# Altium PCB stm32-electronic-dice.PcbDoc
Units mm, origin at the board's own origin, x right, y up, seen from the top; angles counter-clockwise.
Board outline 85 x 60 mm, 2 copper layers (Top Layer, Bottom Layer); 43 components, 29 nets, 141 pads, 0 vias.
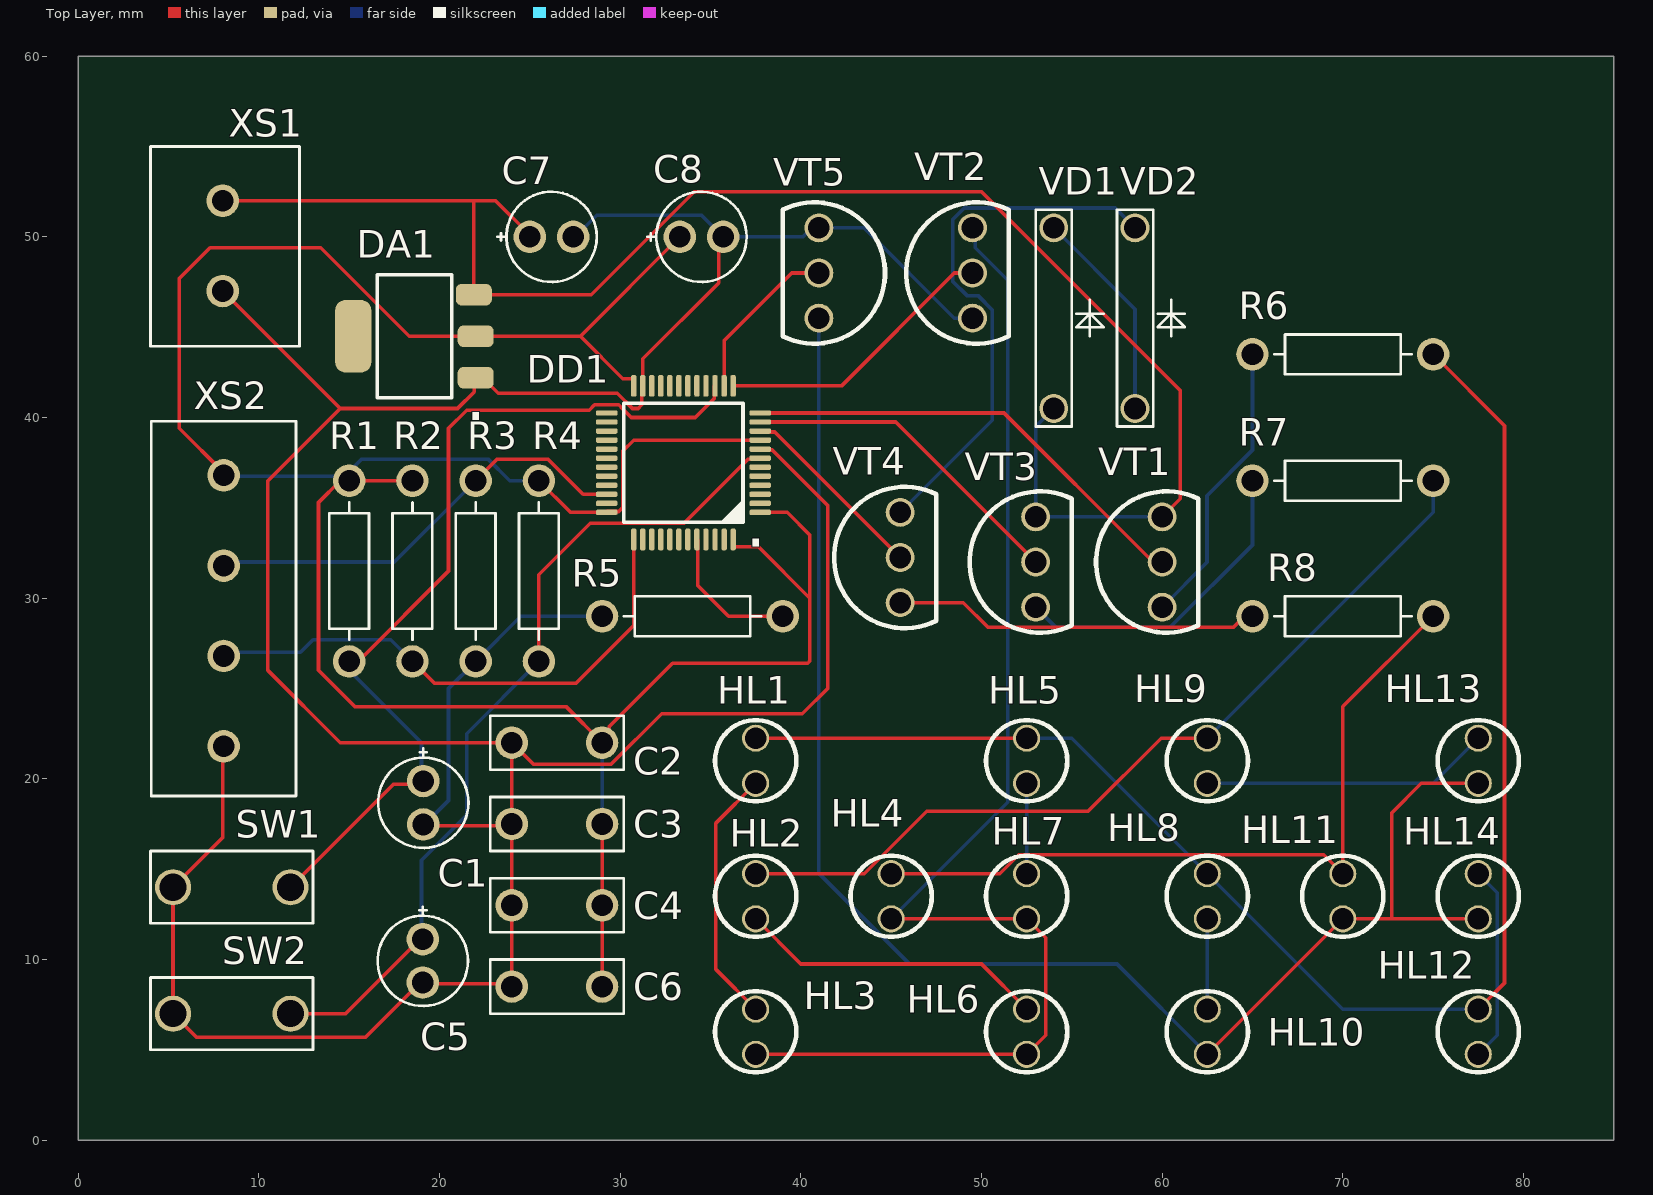
[diagram p0: Top Layer view]
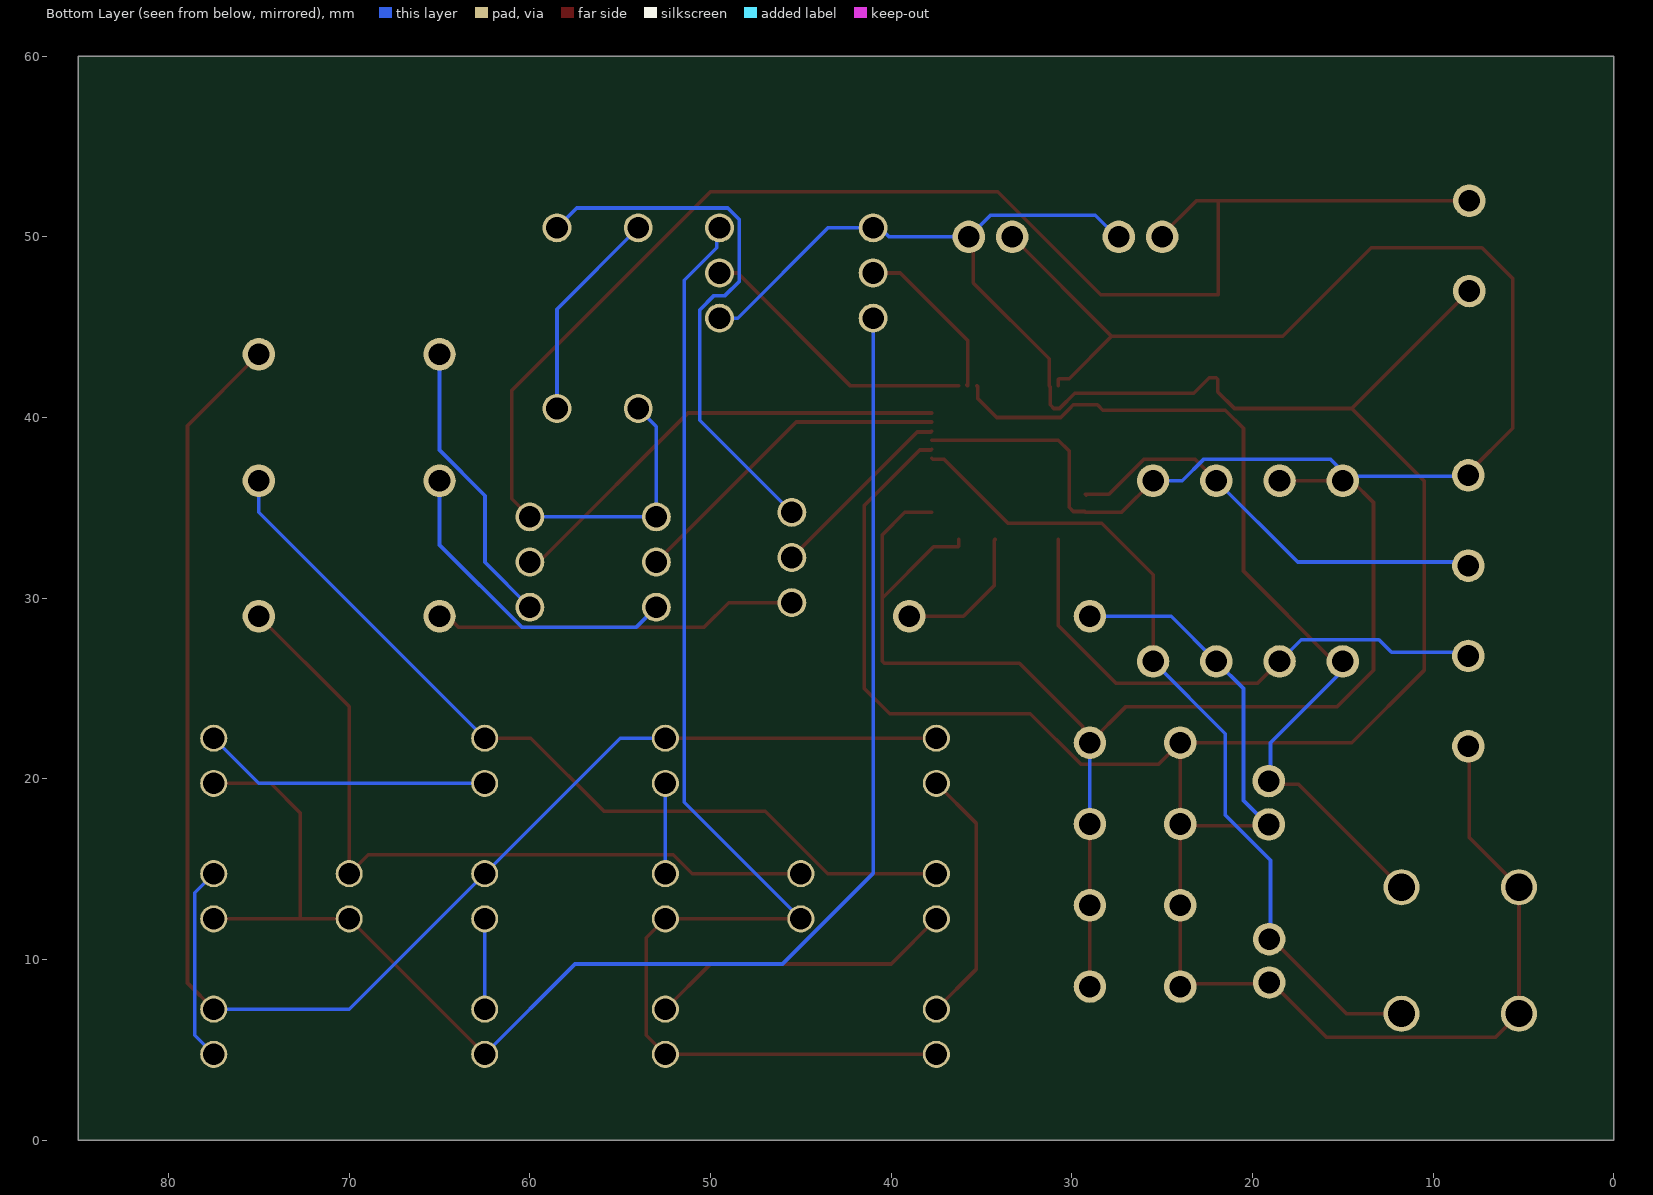
[diagram p1: Bottom Layer view, seen from below]
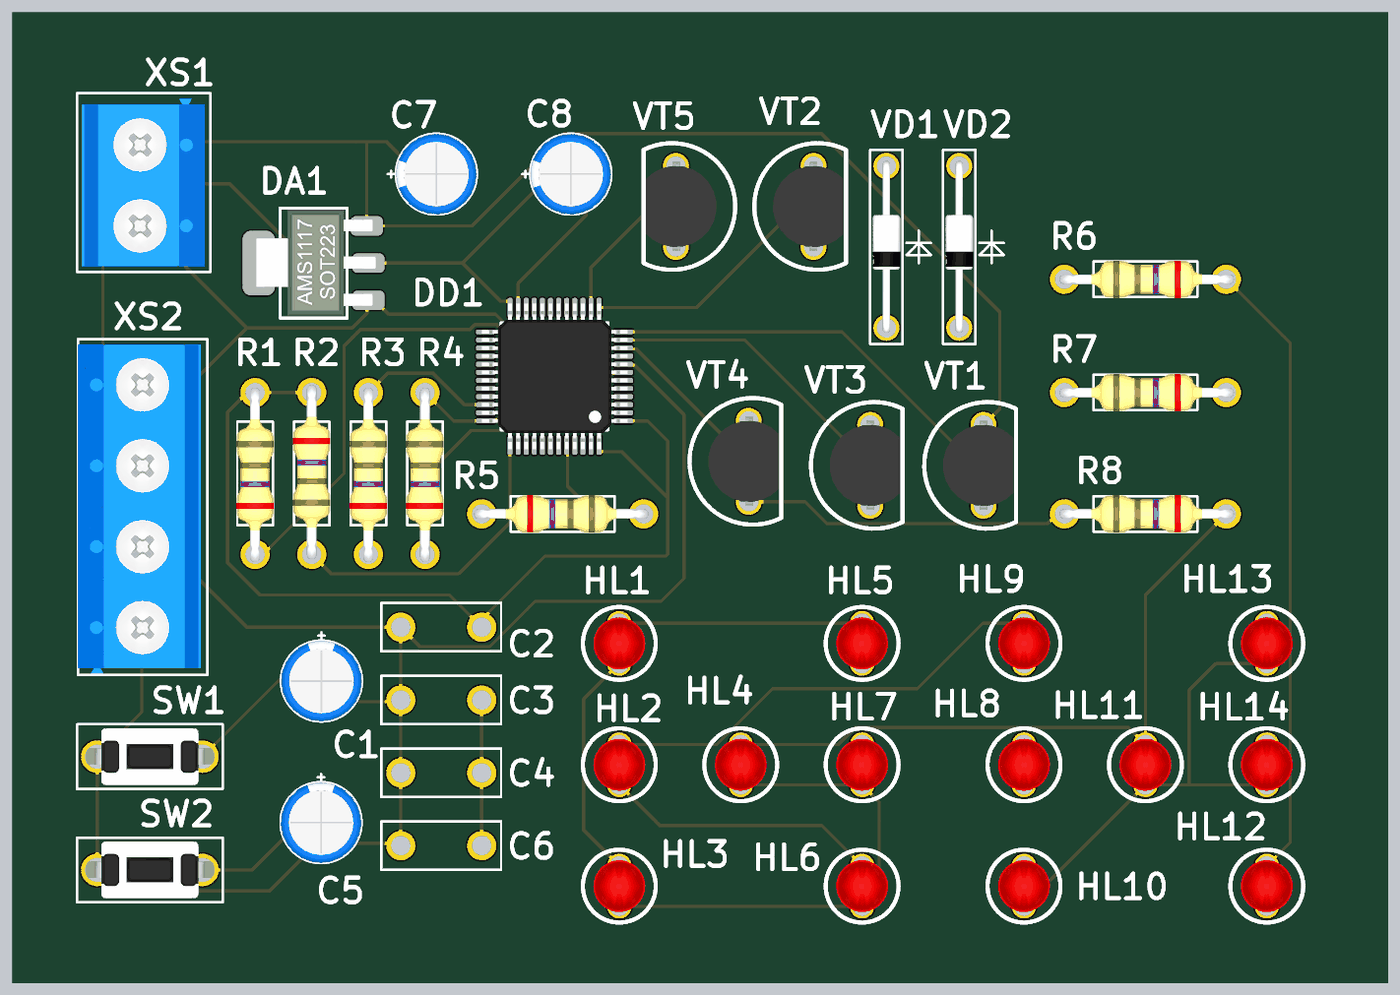
[diagram p2: 3D render of the assembled board from above, using the file's embedded part models]

## Layer stack, top to bottom
Top Solder: solder mask 0.0102, Solder Resist, Dk 3.5
Top Layer: signal copper 0.0356
Dielectric 1: dielectric 0.32, FR-4, Dk 4.8
Bottom Layer: signal copper 0.0356
Bottom Solder: solder mask 0.0102, Solder Resist, Dk 3.5

## Board outline
0,0 85,0 85,60 0,60

## Design rules (kind name [scope] priority, off if disabled: settings)
Clearance "Clearance-1 1 Oz" [All] p1: gap=0.2 ignorepadtopadclearanceinfootprint=FALSE except(0.25: Arc-Hole Track-Hole SMDPad-Hole THPad-Hole Via-Hole Fill-Hole Poly-Hole Region-Hole Text-Hole) // Standart
PolygonConnect [All] p1: connectstyle=Relief reliefconductorwidth=0.254 reliefentries=4 polygonreliefangle="90 Angle" airgapwidth=0.254
RoutingVias [All] p1: holewidth=0.711 width=1.27 viastyle="Through Hole" minholewidth=0.711 minwidth=1.27 maxholewidth=0.711 maxwidth=1.27
SolderMaskExpansion [All] p1: expansion=0.102 istentingtop=FALSE
Width "Width 1 Oz" [All] p1: maxlimit=10 minlimit=0.15 preferedwidth=0.2 checkconnectedcopper=TRUE
30 further rules are at their usual default settings.

## Components (designator, comment, footprint, x,y, rotation, side; value= is the part's Value field where it differs from the comment)
C1 "10uF" C_KM50-35 19.1,18.675 r270 top
C2 "0,1uF" C_KM5B_1000 26.5,22 r180 top
C3 "0,1uF" C_KM5B_1000 26.5,17.5 r180 top
C4 "0,1uF" C_KM5B_1000 26.5,13 r180 top
C5 "10uF" C_KM50-35 19.075,9.925 r270 top
C6 "0,1uF" C_KM5B_1000 26.5,8.5 r180 top
C7 "10uF" C_KM50-35 26.2,50 r0 top
C8 "10uF" C_KM50-35 34.5,50 r0 top
DA1 "AMS1117" DA_SOT-223 22,42.2 r180 top
DD1 "STM32F103C8T6" DD_LQFP-48 33.5,37.5 r180 top
HL1 "HL_LED" HL_LED_3MM 37.5,21 r270 top
HL2 "HL_LED" HL_LED_3MM 37.5,13.5 r270 top
HL3 "HL_LED" HL_LED_3MM 37.5,6 r270 top
HL4 "HL_LED" HL_LED_3MM 45,13.5 r270 top
HL5 "HL_LED" HL_LED_3MM 52.5,21 r270 top
HL6 "HL_LED" HL_LED_3MM 52.5,6 r270 top
HL7 "HL_LED" HL_LED_3MM 52.5,13.5 r270 top
HL8 "HL_LED" HL_LED_3MM 62.5,13.5 r270 top
HL9 "HL_LED" HL_LED_3MM 62.5,21 r270 top
HL10 "HL_LED" HL_LED_3MM 62.5,6 r270 top
HL11 "HL_LED" HL_LED_3MM 70,13.5 r270 top
HL12 "HL_LED" HL_LED_3MM 77.5,6 r270 top
HL13 "HL_LED" HL_LED_3MM 77.5,21 r270 top
HL14 "HL_LED" HL_LED_3MM 77.5,13.5 r270 top
R1 "10k Ω" R_CF-25_C1-4 15,31.5 r90 top
R2 "10k Ω" R_CF-25_C1-4 18.5,31.5 r270 top
R3 "10k Ω" R_CF-25_C1-4 22,31.5 r90 top
R4 "10k Ω" R_CF-25_C1-4 25.5,31.5 r90 top
R5 "10k Ω" R_CF-25_C1-4 34,29 r0 top
R6 "100 Ω" R_CF-25_C1-4 70,43.5 r180 top
R7 "100 Ω" R_CF-25_C1-4 70,36.5 r180 top
R8 "220 Ω" R_CF-25_C1-4 70,29 r180 top
SW1 "SW_Switch" SW_Button 8.5,14 r0 top
SW2 "SW_Switch" SW_Button 8.5,7 r0 top
VD1 "1N4148" VD_DO-35 54,45.5 r90 top
VD2 "1N4148" VD_DO-35 58.5,45.5 r90 top
VT1 "2N7000" VT_TO-92 60,32 r90 top
VT2 "2N7000" VT_TO-92 49.5,48 r90 top
VT3 "2N7000" VT_TO-92 53,32 r90 top
VT4 "2N7000" VT_TO-92 45.5,32.25 r90 top
VT5 "2N7000" VT_TO-92 41,48 r270 top
XS1 "*" X_2Pin_5.0mm 8,49.5 r270 top
XS2 "XS_Connector_4Pin" X_4Pin_5.0mm 8.05,34.3 r270 top

## Footprints (in the part's own frame and the unit in brackets; to place one, negate y for a bottom-side part, rotate by r counter-clockwise, add the part's x,y. Pads: shape width x height; smd on the part's side, far side on the other; paste and mask are expansions set on the pad)
C_KM5B_1000 [mm] "PCB footprint for KM5B capacitor"
  round 1.8 hole 1.2: 1(-2.5,0) 2(2.5,0)
  silkscreen extent -3.7,-1.5 3.7,1.5, body extent -2.79,-1.25 2.79,1.25, height 7.5
C_KM50-35 [mm] "PCB footprint for KM50-35 capacitor"
  round 1.8 hole 1.2: 1(-1.2,0) 2(1.2,0)
  silkscreen extent -3,-2.5 2.5,2.5, body extent -2.5,-2.5 2.5,2.5, height 7
DA_SOT-223 [mm] "Voltage regulator footprint, SOT-223 package"
  rrect55% 2x1.2 smd: 1(0,0) 2(0,-2.3) 3(0.1,-4.6)
  rrect55% 2x4 smd: 4(6.775,-2.3)
  silkscreen extent 1.32,-5.7 5.45,1.1, body extent -0.45,-5.58 6.92,0.92, height 1.8
DD_LQFP-48 [mm] "Microcontroller footprint, LQFP-48 package"
  rrect65% 1.2x0.3 smd: 1(-4.25,2.75) 2(-4.25,2.25) 3(-4.25,1.75) 4(-4.25,1.25) 5(-4.25,0.75) 6(-4.25,0.25) 7(-4.25,-0.25) 8(-4.25,-0.75) 9(-4.25,-1.25) 10(-4.25,-1.75) 11(-4.25,-2.25) 12(-4.25,-2.75) 25(4.25,-2.75) 26(4.25,-2.25) 27(4.25,-1.75) 28(4.25,-1.25) 29(4.25,-0.75) 30(4.25,-0.25) 31(4.25,0.25) 32(4.25,0.75) 33(4.25,1.25) 34(4.25,1.75) 35(4.25,2.25) 36(4.25,2.75)
  rrect65% 0.3x1.2 smd: 13(-2.75,-4.25) 14(-2.25,-4.25) 15(-1.75,-4.25) 16(-1.25,-4.25) 17(-0.75,-4.25) 18(-0.25,-4.25) 19(0.25,-4.25) 20(0.75,-4.25) 21(1.25,-4.25) 22(1.75,-4.25) 23(2.25,-4.25) 24(2.75,-4.25) 37(2.75,4.25) 38(2.25,4.25) 39(1.75,4.25) 40(1.25,4.25) 41(0.75,4.25) 42(0.25,4.25) 43(-0.25,4.25) 44(-0.75,4.25) 45(-1.25,4.25) 46(-1.75,4.25) 47(-2.25,4.25) 48(-2.75,4.25)
  silkscreen extent -3.3,-3.3 3.3,3.3, body extent -4.5,-4.5 4.5,4.5, height 1.59
HL_LED_3MM [mm] "PCB footprint for LED 3mm"
  round 1.5 hole 1.2: 1(-1.25,0) 2(1.25,0)
  silkscreen extent -2.25,-2.25 2.25,2.25, body extent -1.6,-1.6 1.6,1.6, height 7.5
R_CF-25_C1-4 [mm] "PCB footprint for CF-25 / C1-4 resistor"
  round 1.8 hole 1.2: 1(-5,0) 2(5,0)
  silkscreen extent -3.8,-1.1 3.8,1.1, body extent -5.47,-1.16 5.3,1.16, height 2.93
SW_Button [mm] "PCB footprint for push-button switch"
  round 2 hole 1.5: 1(-3.25,0) 2(3.25,0)
  silkscreen extent -4.5,-2 4.5,2, body extent -4.05,-1.75 4.05,1.75, height 5.4
VD_DO-35 [mm] "PCB footprint for DO-35 diode"
  round 1.6 hole 1.2: 1(-5,0) 2(5,0)
  silkscreen extent -6,-2.75 6,1, body extent -5.31,-0.85 5.31,0.85, height 1.85
VT_TO-92 [mm] "Transistor footprint, TO-92 package"
  round 1.6 hole 1.2: 1(-2.5,0) 2(0,0) 3(2.5,0)
  silkscreen extent -3.91,-2 3.91,3.66, body extent -2.75,-1.85 2.75,2.5, height 8.2
X_2Pin_5.0mm [mm] "2-pin connector footprint, 5.0 mm pitch"
  round 1.8 hole 1.2: 1(-2.5,0) 2(2.5,0)
  silkscreen extent -5.5,-4 5.55,4.25, body extent -5.15,-3.7 5.2,3.9, height 10.46
X_4Pin_5.0mm [mm] "4-pin connector footprint, 5.0 mm pitch"
  round 1.8 hole 1.2: 1(-2.5,0) 2(2.5,0) 3(7.5,0) 4(12.5,0)
  silkscreen extent -5.5,-4 15.25,4, body extent -5.17,-4 15.18,3.6, height 10.46

## Part data
C1 C5 C7 C8: library part C_Polarized, "Polarized capacitor"
C2 C3 C4 C6: library part C_NonPolarized, "Non-polarized capacitor"
DA1: library part DA_AMS1117, "Linear voltage regulator, AMS1117 series"
DD1: library part DD_STM32F103C8T6, "STM32F103C8T6 microcontroller, LQFP-48 package"
HL1 HL2 HL3 HL4 HL5 HL6 HL7 HL8 HL9 HL10 HL11 HL12 HL13 HL14: "Light-emitting diode (LED)"
R1 R2 R3 R4 R5 R6 R7 R8: library part R_Resistor, "Fixed resistor"
SW1 SW2: "Switch"
VD1 VD2: library part VD_Diode, "Diode"
VT1 VT2 VT3 VT4 VT5: library part VT_MOSFET_NChannel, "N-channel MOSFET"
XS1: library part XS_Connector_2Pin, "2-pin connector (socket)"
XS2: "4-pin connector (socket)"

## Nets (pads, with @x,y where several pads share a name; then routed paths per layer and width w, separated by ;. In a path a pad name is that pad's centre, name@x,y a point inside that pad or via, vN(x,y) a via of type N, cw(c..) or ccw(c..) an arc to the next point about the centre after c; other vN are vias at no path point)
+3,3V: C2.1 C3.1 C4.1 C6.1 C8.1 DA1.2 DD1.1 DD1.9 DD1.24 DD1.36 DD1.48 R1.2 R2.1 R4.2 XS2.1 | length 160.3
  Top Layer w0.2: XS2.1@8.02,36.98 5.6,39.4 5.6,47.7 7.3,49.4 13.427,49.4 18.327,44.5 DA1.2 27.8,44.5 ; R2.1@18.433,37 18.5,37 R2.1 14.5,36.5 13.3,35.3 13.3,26.003 15.303,24 27,24 C2.1 29,22.433 29.399,22.831 29.399,22.899 32.9,26.4 40.383,26.4 40.5,26.517 40.5,30 ; R4.2 27.25,34.75 DD1.36 29.3,34.8 29.917,34.8 30.15,35.033 30.15,38.15 30.75,38.75 DD1.9 ; C6.1 C4.1 C3.1 ; DD1.24 30.75,42.103 30.7,42.153 30.147,42.153 27.8,44.5 ; C8.1 27.8,44.5 ; DD1.48 36.25,32.897 36.3,32.847 37.653,32.847 40.5,30 ; DD1.1 39.25,34.75 40.5,33.5 40.5,30
  Bottom Layer w0.2: XS2.1@8,37 8.25,36.75 R1.2@14.5,36.75 ; R1.2@14.5,36.5 15.7,37.7 22.685,37.7 23.885,36.5 R4.2 ; R2.1@18.25,36.75 R2.1 ; C3.1 C2.1
+4,5V: C7.1 DA1.3 VD1.1 VT1.3 VT3.3 XS1.1 | length 90
  Top Layer w0.2: XS1.1 21.9,52 ; C7.1@25.1,50 23.1,52 21.9,52 ; VT1.3 61,35.5 61,41.5 50,52.5 34.103,52.5 28.403,46.8 DA1.3 21.9,52
  Bottom Layer w0.2: VD1.1 53,39.5 VT3.3 VT1.3
DGND: C1.2 C2.2 C3.2 C4.2 C5.2 C6.2 C7.2 C8.2 DA1.1 DD1.8 DD1.23 R3.1 R5.1 SW1.1 SW2.1 VT2.1 VT5.1 XS1.2 XS2.4 | length 204.3
  Top Layer w0.2: XS2.4@8,22 8,16.75 SW1.1 SW2.1 6.55,5.7 15.9,5.7 19,8.8 19.15,8.65 23.85,8.65 C6.2 C4.2 C3.2 ; XS1.2 14.5,40.5 ; C1.2@19,17.3 19.1,17.4 23.9,17.4 C3.2 ; C8.2@35.808,49.308 35.498,49.308 35.451,49.261 35.451,47.451 31.25,43.25 DD1.23 31.2,41.7 31.2,40.7 31,40.5 30.683,40.5 29.837,41.346 23.254,41.346 22.4,42.2 DA1.1 21.917,42.117 21.917,41.417 21,40.5 14.5,40.5 ; DD1.8 37.8,38.2 38.417,38.2 41.5,35.117 41.5,25.017 40.083,23.6 32.297,23.6 29.497,20.8 25.2,20.8 C2.2 ; 14.5,40.5 10.5,36.5 10.5,26 14.5,22 C2.2 ; C3.2 C2.2
  Bottom Layer w0.2: C5.2@19,8.8 C5.2@19.15,8.65 ; C1.2@19,17.3 20.5,18.8 20.5,25 R3.1 24.5,29 R5.1 ; C6.2@23.85,8.65 C6.2 ; C7.2@27.5,50 28.7,51.2 34.5,51.2 C8.2 40.121,50 40.621,50.5 VT5.1 43.5,50.5 48.5,45.5 VT2.1
NetDD1_44: DD1.44 R5.2 | length 8
  Top Layer w0.2: DD1.44 34.3,33.2 34.3,30.7 36,29 R5.2
NetHL1_1: HL1.1 HL5.1 HL8.1 HL12.1 R6.1 | length 84.7
  Top Layer w0.2: HL1.1 HL5.1 ; R6.1 78.95,39.55 78.95,8.7 HL12.1
  Bottom Layer w0.2: HL5.1 55,22.25 HL8.1 70,7.25 HL12.1
NetHL1_2: HL1.2 HL3.1 | length 14.3
  Top Layer w0.2: HL3.1 35.3,9.45 35.3,17.55 HL1.2
NetHL2_1: HL2.1 HL9.1 R7.1 | length 47.5
  Top Layer w0.2: HL2.1 43.515,14.75 46.965,18.2 55.9,18.2 59.95,22.25 HL9.1
  Bottom Layer w0.2: HL9.1 75,34.75 R7.1
NetHL2_2: HL2.2 HL6.1 | length 17.1
  Top Layer w0.2: HL2.2 40,9.75 50,9.75 HL6.1
NetHL3_2: HL3.2 HL4.2 HL6.2 HL7.2 VT2.3 | length 72.6
  Top Layer w0.2: HL3.2 52.5,4.75 53.55,5.8 53.55,11.2 HL7.2 HL4.2
  Bottom Layer w0.2: HL4.2 51.45,18.7 51.45,47.606 49.656,49.4 49.656,50.344 VT2.3
NetHL4_1: HL4.1 HL11.1 R8.1 | length 42.2
  Top Layer w0.2: HL4.1 51.015,14.75 52.065,15.8 68.95,15.8 HL11.1 70,24 R8.1
NetHL5_2: HL5.2 HL7.1 | length 5
  Bottom Layer w0.2: HL7.1 HL5.2
NetHL8_2: HL8.2 HL10.1 | length 5
  Bottom Layer w0.2: HL10.1 HL8.2
NetHL9_2: HL9.2 HL13.1 | length 16
  Bottom Layer w0.2: HL9.2 75,19.75 HL13.1
NetHL10_2: HL10.2 HL11.2 HL13.2 HL14.2 VT5.3 | length 85.8
  Top Layer w0.2: HL10.2 HL11.2 72.7,12.25 ; HL14.2 72.7,12.25 ; HL13.2 74.35,19.75 72.7,18.1 72.7,12.25
  Bottom Layer w0.2: VT5.3 41,14.765 46.017,9.748 57.502,9.748 HL10.2
NetHL12_2: HL12.2 HL14.1 | length 10.9
  Bottom Layer w0.2: HL12.2 78.55,5.8 78.55,13.7 HL14.1
NetR6_2: R6.2 VT1.1 | length 16.1
  Bottom Layer w0.2: VT1.1 62.481,31.981 62.481,35.678 65,38.197 R6.2
NetR7_2: R7.2 VT3.1 | length 17.9
  Bottom Layer w0.2: VT3.1 54.1,28.4 60.456,28.4 65,32.944 R7.2
NetR8_2: R8.2 VT4.1 | length 20.3
  Top Layer w0.2: VT4.1 48.992,29.75 50.342,28.4 63.967,28.4 64.567,29 R8.2
NetVD1_2: VD1.2 VD2.1 | length 11.9
  Bottom Layer w0.2: VD1.2 58.5,46 VD2.1
NetVD2_2: VD2.2 VT4.3 | length 30.4
  Bottom Layer w0.2: VT4.3 50.6,39.85 50.6,45.956 49.806,46.75 49.194,46.75 48.4,47.544 48.4,50.956 49.044,51.6 57.4,51.6 VD2.2
NRST: C5.1 DD1.7 R4.1 SW2.2 | length 46.7
  Top Layer w0.2: SW2.2 14.8,7 C5.1@19,11.2 ; R4.1 25.5,31.3 28.35,34.15 33.533,34.15 37.083,37.7 37.148,37.7 37.7,37.7 DD1.7
  Bottom Layer w0.2: C5.1@19,11.2 19,15.5 21.5,18 21.5,22.5 R4.1
PA0: DD1.10 VT4.2 | length 10.6
  Top Layer w0.2: DD1.10 37.8,39.2 38.55,39.2 VT4.2
PA1: DD1.11 VT3.2 | length 18.5
  Top Layer w0.2: DD1.11 45.25,39.75 VT3.2
PA2: DD1.12 VT1.2 | length 25.7
  Top Layer w0.2: DD1.12 51.25,40.25 59.232,32.268 59.732,32.268 VT1.2
PA3: DD1.13 VT2.2 | length 15.8
  Top Layer w0.2: DD1.13 42.25,41.75 48.5,48 VT2.2
PA4: DD1.14 VT5.2 | length 9.4
  Top Layer w0.2: DD1.14@35.8,41.8 DD1.14 35.75,44.25 39.5,48 VT5.2
PA5: C1.1 DD1.15 R1.1 SW1.2 | length 50.9
  Top Layer w0.2: SW1.2 17.45,19.7 C1.1@19,19.7 ; R1.1@14.5,26.5 14.583,26.583 15.583,26.583 20.5,31.5 20.5,39.4 21.5,40.4 28.283,40.4 28.583,40.7 29.917,40.7 30.15,40.467 30.617,40 34.151,40 35.217,41.066 35.217,41.717 DD1.15
  Bottom Layer w0.2: R1.1@14.5,26.5 19,22 C1.1@19,19.7
SWCLK: DD1.37 R2.2 XS2.3 | length 30.1
  Top Layer w0.2: R2.2 19.7,25.3 27.563,25.3 30.75,28.487 DD1.37
  Bottom Layer w0.2: XS2.3@8,27 12.3,27 13,27.7 17.3,27.7 R2.2
SWDIO: DD1.34 R3.2 XS2.2 | length 24.5
  Top Layer w0.2: R3.2 23.2,37.7 25.997,37.7 27.947,35.75 DD1.34 DD1.34@29.2,35.7
  Bottom Layer w0.2: XS2.2@8,32 17.5,32 R3.2
pads on no net: DA1.4 DD1.2 DD1.3 DD1.4 DD1.5 DD1.6 DD1.16 DD1.17 DD1.18 DD1.19 DD1.20 DD1.21 DD1.22 DD1.25 DD1.26 DD1.27 DD1.28 DD1.29 DD1.30 DD1.31 DD1.32 DD1.33 DD1.35 DD1.38 DD1.39 DD1.40 DD1.41 DD1.42 DD1.43 DD1.45 DD1.46 DD1.47